# EAGLE board Placa 1.1.1} (EAGLE 9.7.0)
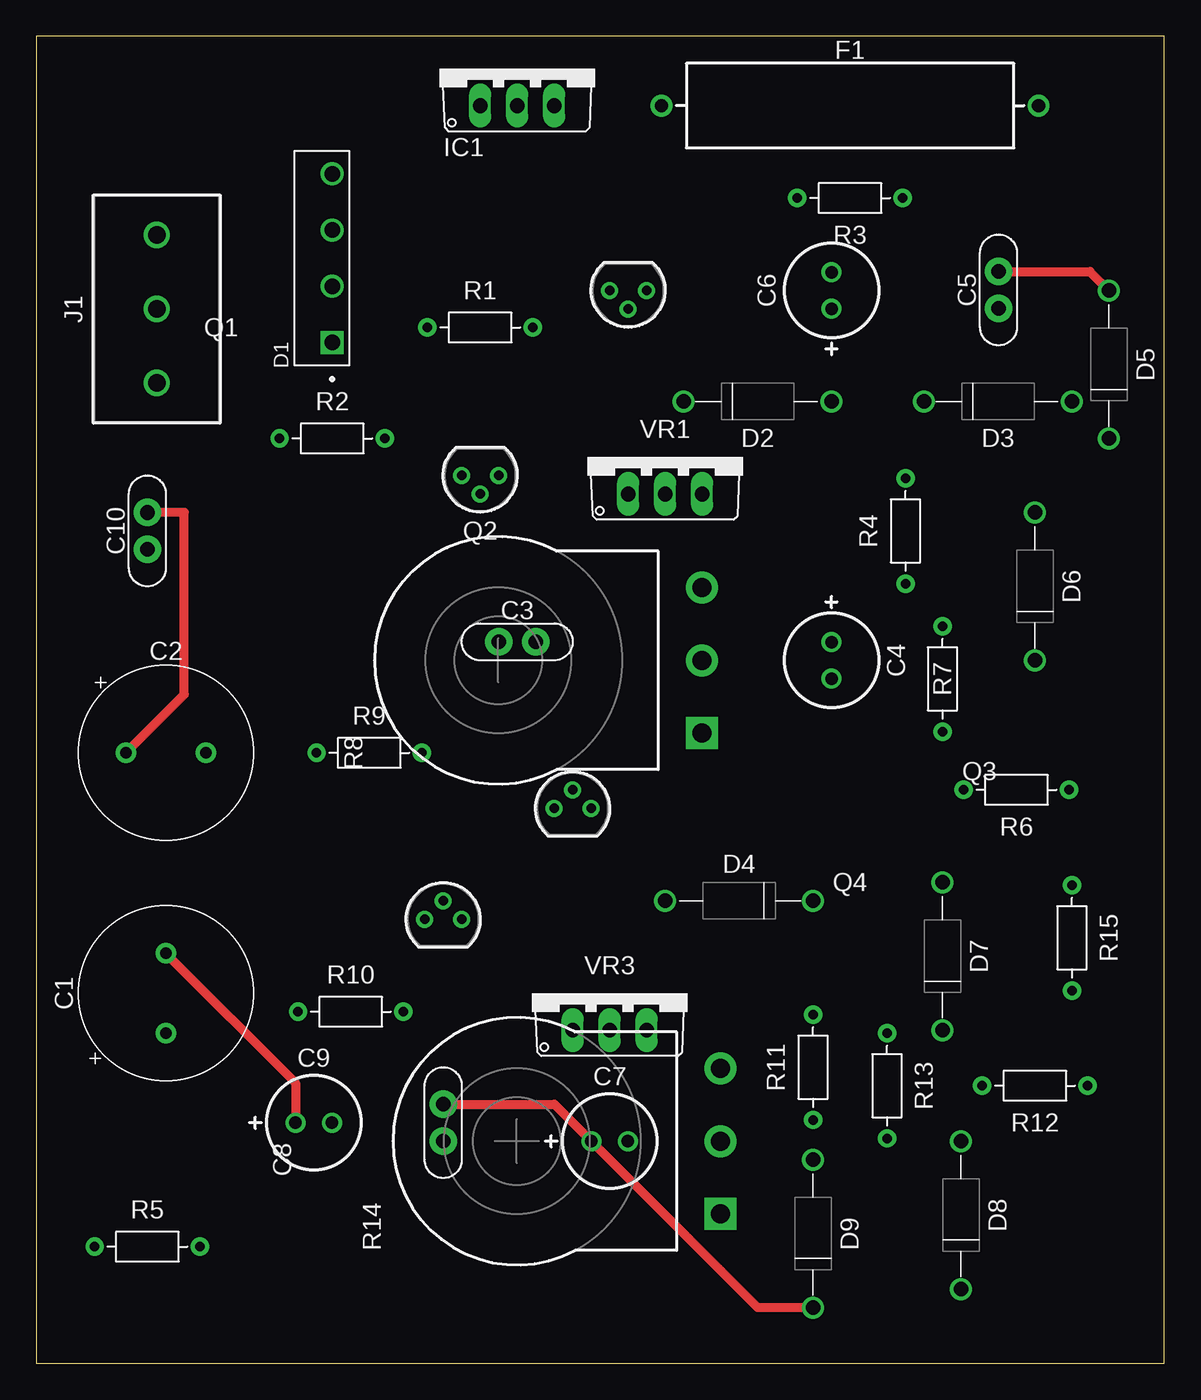
[diagram p0: board, top side]
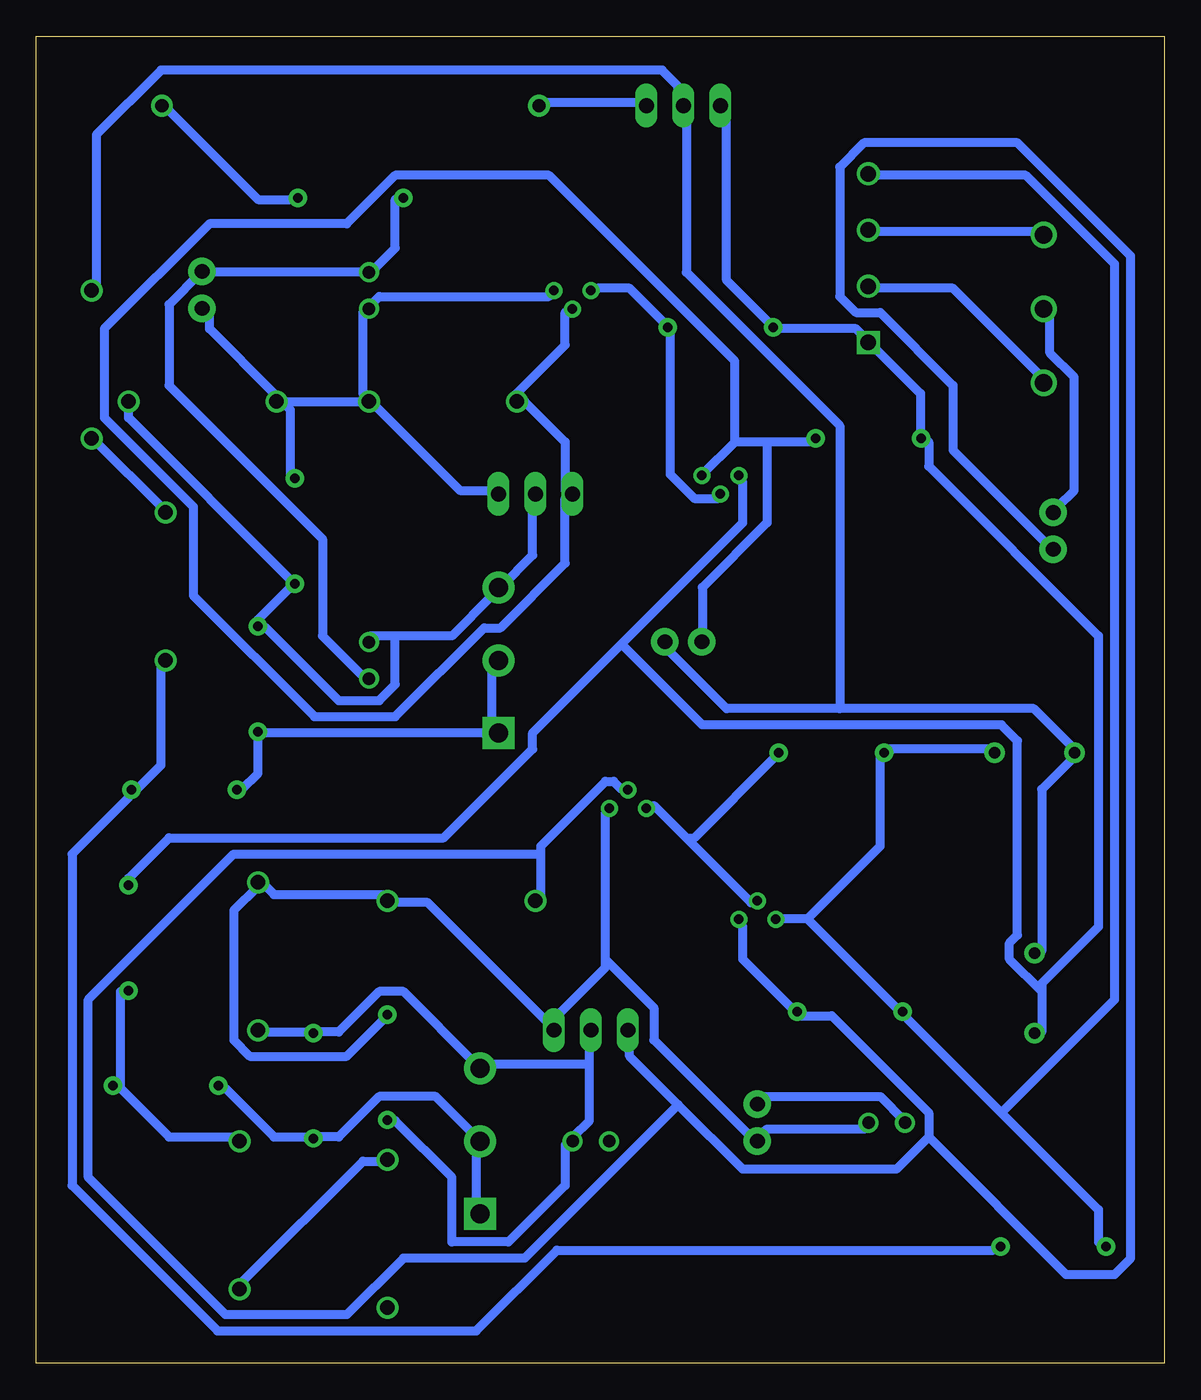
[diagram p1: board, bottom side, seen from below]

Size 77.45 x 91.11 mm. Coordinates in mm from the lower left corner, seen from the top.
Outline: 0,0 77.45,0 77.45,91.11 0,91.11 0,0
Copper layers (1*16): Top 0.035mm / dielectric 1.5mm / Bottom 0.035mm
Design rules "Fusion Electronics Design Rules": minimum track width 0.61mm, minimum drill 0.8mm, track to track 0.5mm, track to pad 0.5mm, pad to pad 0.5mm, via to via 0.5mm, smd to smd 6mil, copper to edge 40mil, drill to drill 6mil, minimum pad ring 10mil, minimum via ring 8mil, stop-mask expansion 4mil, vias tented up to drill 9999mil, thermal gap 10mil

## Footprints (pad centres in the part's own frame; a part is rotated, then mirrored left to right if it is on the bottom)
CAPPRD550W60D1200H2000B = drill 0.8 pad 1.4: 1 -2.75,0; 2 2.75,0
CAP-THRU-2.54MM = drill 1.016 pad 1.88: 1 -1.27,0; 2 1.27,0
CAPPRD250W80D630H800B = drill 0.864 pad 1.372: 1 -1.25,0; 2 1.25,0
SIP380W81P386L1470H1270Q4 = drill 1.06 pad 1.59 square: 1 0,0 | drill 1.06 pad 1.59: 2 3.865,0; 3 7.73,0; 4 11.595,0
DIODE-AXIAL = drill 1: 1 -5.08,0; 2 5.08,0
FUSAD2590W70L2150D550B = drill 0.9 pad 1.5: 1 -12.95,0; 2 12.95,0
TO220V = drill 1.016 long: 1 -2.54,-2.54; 2 0,-2.54; 3 2.54,-2.54
TERMBLK_508-3N = drill 1.2: 1 -5.08,0; 2 0,0; 3 5.08,0
TO92 = drill 0.66: 1 -1.27,0; 2 0,1.27; 3 1.27,0
RESAD724W46L381D178B = drill 0.66 pad 1.26: 1 -3.62,0; 2 3.62,0
WH148-5.0 = drill 1.3 pad 2.2 square: 1 -5,0 | drill 1.3 pad 2.2: 2 0,0; 3 5,0

## Placement (x,y rotation side)
C1  10000uF  [CAPPRD550W60D1200H2000B]  8.89,25.4 90 top
C2  10000uF  [CAPPRD550W60D1200H2000B]  8.89,41.91 0 top
C3  100nF  [CAP-THRU-2.54MM]  33.02,49.53 0 top
C4  10uF  [CAPPRD250W80D630H800B]  54.61,48.26 270 top
C5  100nF  [CAP-THRU-2.54MM]  66.08,73.7 90 top
C6  10uF  [CAPPRD250W80D630H800B]  54.61,73.66 90 top
C7  10uF  [CAPPRD250W80D630H800B]  39.37,15.24 0 top
C8  100nF  [CAP-THRU-2.54MM]  27.94,16.51 90 top
C9  10uF  [CAPPRD250W80D630H800B]  19.05,16.51 0 top
C10  100nF  [CAP-THRU-2.54MM]  7.62,57.15 90 top
D1  KBP206  [SIP380W81P386L1470H1270Q4]  20.32,70.08 90 top
D2  DIODEDIODE-AXIAL  [DIODE-AXIAL]  49.53,66.04 180 top
D3  DIODEDIODE-AXIAL  [DIODE-AXIAL]  66.04,66.04 180 top
D4  DIODEDIODE-AXIAL  [DIODE-AXIAL]  48.26,31.75 0 top
D5  DIODEDIODE-AXIAL  [DIODE-AXIAL]  73.66,68.58 270 top
D6  DIODEDIODE-AXIAL  [DIODE-AXIAL]  68.58,53.34 270 top
D7  DIODEDIODE-AXIAL  [DIODE-AXIAL]  62.23,27.94 270 top
D8  DIODEDIODE-AXIAL  [DIODE-AXIAL]  63.5,10.16 270 top
D9  DIODEDIODE-AXIAL  [DIODE-AXIAL]  53.34,8.89 270 top
F1  fusible  [FUSAD2590W70L2150D550B]  55.88,86.36 0 top
IC1  LM7805_TO220V  [TO220V]  33.02,88.9 0 top
J1  12-0-12  [TERMBLK_508-3N]  8.27,72.39 90 top
Q1  PNP_MJ2955G  [TO92]  40.64,73.66 180 top
Q2  PNP_2N2907  [TO92]  30.48,60.96 180 top
Q3  NPN_2N3055G  [TO92]  36.83,38.1 0 top
Q4  NPN_BD139G  [TO92]  27.94,30.48 0 top
R1  0.33  [RESAD724W46L381D178B]  30.48,71.12 0 top
R2  3.3  [RESAD724W46L381D178B]  20.32,63.5 0 top
R3  10  [RESAD724W46L381D178B]  55.88,80.01 180 top
R4  120  [RESAD724W46L381D178B]  59.69,57.15 90 top
R5  1k  [RESAD724W46L381D178B]  7.62,8 0 top
R6  7  [RESAD724W46L381D178B]  67.31,39.37 180 top
R7  5k  [RESAD724W46L381D178B]  62.23,46.99 270 top
R8  2k  [WH148-5.0]  45.72,48.26 90 top
R9  0.33  [RESAD724W46L381D178B]  22.86,41.91 0 top
R10  0.33  [RESAD724W46L381D178B]  21.59,24.13 0 top
R11  120  [RESAD724W46L381D178B]  53.34,20.32 90 top
R12  7  [RESAD724W46L381D178B]  68.58,19.05 180 top
R13  5k  [RESAD724W46L381D178B]  58.42,19.05 270 top
R14  2k  [WH148-5.0]  46.99,15.24 90 top
R15  1k  [RESAD724W46L381D178B]  71.12,29.21 270 top
VR1  LM317K  [TO220V]  43.18,62.23 0 top
VR3  LM317K  [TO220V]  39.37,25.4 0 top

## Library data of the parts
C1 C2 = Capacitor; CATEGORY_L1: Capacitor; CATEGORY_L2: Aluminum Electrolytic Capacitors; CATEGORY_L3: Radial Can; PACKAGE: Through Hole; PACKAGE_SIZE: 20MM-DIA
C3 C5 C8 C10 D2-D9 IC1 = Tinkercad
C4 C6 C7 C9 = Capacitor; CATEGORY_L1: Capacitor; CATEGORY_L2: Aluminum Electrolytic Capacitors; CATEGORY_L3: Radial Can; DESCRIPTION: Radial Polarized Capacitor, 0.098" (2.50mm) pitch, 0.248" Dia (6.30mm) body diameter, 0.315" (8.00mm) body height; PACKAGE: Through Hole
D1 = KBP206_RECTIFICADOR; AVAILABILITY: In Stock; CHECK_PRICES: https://www.snapeda.com/parts/KBP206/GeneSiC+Semiconductor/view-part/?ref=eda; DESCRIPTION: Bridge Rectifier Single Phase Standard 600 V Through Hole KBP; MF: GeneSiC Semiconductor; MP: KBP206; PACKAGE: SIP-4 GeneSiC Semiconductor; PRICE: None; SNAPEDA_LINK: https://www.snapeda.com/parts/KBP206/GeneSiC+Semiconductor/view-part/?ref=snap
F1 = Fuse; CATEGORY_L1: Circuit Protection; CATEGORY_L2: Fuses; CATEGORY_L3: Cartridge, Glass; CATEGORY_L4: Slow Blow; DESCRIPTION: FUSE GLASS 200MA 250VAC 5X20MM; HOLD_CURRENT: 200 mA; MANUFACTURER: Littelfuse Inc.; MAXTEMP: 125 C; MPN: 0213.200MXE; OPERATING_TEMPERATURE: -55°C ~ 125°C; PACKAGE: Through Hole; PACKAGE_SIZE: 5mm x 20mm (Axial); PART_STATUS: Obsolete; ROHS: Compliant; SERIES: 213; TRIP_CURRENT: 35A; VENDOR: Digikey; VPN: 0213.200MXE-ND
J1 = Connector; CATEGORY_L1: Connectors; CATEGORY_L2: Terminal Block; CATEGORY_L3: Screw Terminal - Rising Cage Clamp Side Wire Entry; DATASHEET: https://www.te.com/usa-en/product-282837-3.datasheet.pdf; DESCRIPTION: 3 Position Wire to Board Terminal Block Horizontal with Board 0.200" (5.08mm) Through Hole; MANUFACTURER: TE Connectivity AMP Connectors; MPN: 282837-3; OPERATING_TEMPERATURE: -40°C ~ 105°C; PACKAGE: Through Hole; PACKAGE_SIZE: NA; PART_STATUS: Active; PITCH: 0.200" (5.08mm); ROHS: Compliant; SERIES: Buchanan
Q1 Q2 = Transistor; CATEGORY_L1: Transistor; CATEGORY_L2: BJT; CATEGORY_L3: PNP; DATASHEET: https://www.analog.com/media/en/package-pcb-resources/package/pkg_pdf/to-92t/T-3-1.pdf; DESCRIPTION: Generic NPN Transistor through Hole TO92-CBE Package; PACKAGE: Through Hole; PACKAGE_SIZE: TO92
Q3 Q4 = Transistor; CATEGORY_L1: Transistor; CATEGORY_L2: BJT; CATEGORY_L3: NPN; DATASHEET: https://www.analog.com/media/en/package-pcb-resources/package/pkg_pdf/to-92t/T-3-1.pdf; DESCRIPTION: Generic NPN Transistor through Hole TO92-EBC Package; PACKAGE: Through Hole; PACKAGE_SIZE: TO92
R1-R7 R9-R13 R15 = Resistor; CATEGORY_L1: Resistors; DESCRIPTION: Axial Resistor 7.24 mm pitch 3.81 mm body length 1.78 mm body diameter; PACKAGE: Through Hole; PACKAGE_SIZE: Axial
R8 R14 = Potenciometro_WH148
VR1 VR3 = Mis_Componentes; CATEGORY_L1: Power Management IC; CATEGORY_L2: Voltage Regulators; CATEGORY_L3: Linear & LDO Regulators; DESCRIPTION: Linear Voltage Regulator IC TO-220; PACKAGE: Through Hole; PACKAGE_SIZE: TO-220; SERIES: LM7805

## Nets
+VIN: C1.1 D1.1 IC1.1 Q2.3 R1.1 R2.1 R15.1
-VIN: C2.2 D1.4 Q4.1 R5.1 R9.1 R10.1
AC1: D1.2 J1.1
AC2: D1.3 J1.3
GND: C1.2 C2.1 C3.2 C4.2 C5.2 C6.2 C7.1 C8.2 C9.1 C10.2 D5.1 D9.2 IC1.2 J1.2 R3.2
N$1: C5.1 C6.1 D2.1 D3.2 Q1.1 R4.2 VR1.3
N$2: R6.2 R7.2 R8.1 R8.2
N$3: Q1.3 Q2.2 R1.2
N$4: C3.1 D2.2 Q1.2 Q2.1 R2.2 VR1.1
N$5: C4.1 D3.1 R4.1 R7.1 R8.3 VR1.2
N$6: F1.1 IC1.3
N$7: D5.2 D6.1
N$8: D6.2 R5.2 R6.1
N$9: F1.2 R3.1
N$10: Q3.1 Q4.2 R9.2
N$11: C8.1 C9.2 D4.2 D7.1 Q3.3 R11.2 VR3.3
N$12: C10.1 D4.1 Q3.2 Q4.3 R10.2 VR3.1
N$13: C7.2 D7.2 R11.1 R13.1 R14.3 VR3.2
N$14: R12.2 R13.2 R14.1 R14.2
N$15: D8.2 D9.1
N$18: D8.1 R12.1 R15.2

## Tracks (layer width: path | path; a pad name or v marks a point on that pad's centre or on a via)
+VIN
  Bottom 0.61: 37.26,49.38 43.36,43.28 43.36,42.17 49.47,36.06 68.34,36.06 71.11,33.29 R15.1 | 37.26,49.38 28.93,57.71 28.93,60.48 Q2.3 | 8.4,25.52 8.4,26.08 4.51,29.96 4.51,49.94 16.17,61.59 16.17,63.26 R2.1 16.73,63.81 16.73,66.59 20.05,69.92 D1.1 20.61,70.47 21.17,71.03 26.71,71.03 R1.1 27.27,71.58 30.04,74.36 30.04,86.02 IC1.1 | 8.4,25.52 8.4,22.75 C1.1 | 37.26,49.38 31.71,43.84 11.17,43.84 10.06,42.73 10.06,29.41 10.62,28.85 10.62,27.74 8.4,25.52
-VIN
  Bottom 0.61: C2.2 11.73,42.17 18.95,42.17 R9.1 19.5,41.62 19.5,35.51 24.5,30.52 | 24.5,30.52 26.16,30.52 Q4.1 | 24.5,30.52 18.39,24.41 R10.1 17.84,23.85 11.17,17.2 | 11.17,17.2 4.51,10.54 4.51,8.31 R5.1 | 11.17,17.2 3.4,24.96 3.4,75.47 9.51,81.58 20.05,81.58 D1.4
AC1
  Bottom 0.61: D1.2 20.05,73.8 14.51,73.8 8.4,67.7 J1.1
AC2
  Bottom 0.61: D1.3 20.05,77.69 8.4,77.69 J1.3
GND
  Top 0.61: D9.2 49.55,3.81 C7.1 35.58,17.78 C8.2 | C1.2 17.8,19.24 C9.1 | C2.1 10.16,45.93 10.16,58.42 C10.2 | C5.2 72.36,74.97 D5.1
  Bottom 0.61: C1.2 8.4,28.3 8.4,39.39 6.18,41.62 C2.1 6.18,42.17 8.96,44.95 22.28,44.95 | 22.28,44.95 30.04,44.95 33.93,48.83 33.93,49.38 C3.2 | D5.1 73.33,73.8 73.33,84.35 68.89,88.79 34.48,88.79 33.38,87.68 33.38,86.57 IC1.2 32.82,86.02 32.82,74.92 22.28,64.37 22.28,44.95 | C9.1 17.84,16.64 19.5,18.3 27.83,18.3 C8.2 | J1.2 7.84,72.14 7.84,69.36 6.18,67.7 6.18,59.93 7.29,58.82 C10.2 | R3.2 52.8,79.91 52.8,76.58 54.46,74.92 C6.2 55.02,74.92 65.56,74.92 C5.2 66.12,74.92 68.34,72.69 68.34,67.14 57.79,56.6 57.79,49.94 55.02,47.16 C4.2
N$1
  Bottom 0.61: Q1.1 42.25,73.25 53.91,73.25 54.46,72.69 C6.1 55.02,72.14 55.02,66.59 D2.1 | 60.57,66.03 60.02,65.48 60.02,61.04 R4.2 | 60.57,66.03 55.02,66.03 D2.1 | 60.57,66.03 D3.2 61.12,66.59 65.56,71.03 65.56,72.14 C5.1 | VR1.3 46.14,59.93 48.36,59.93 54.46,66.03 D2.1
N$2
  Bottom 0.61: R6.2 63.34,39.39 62.23,40.51 62.23,43.28 R7.2 61.68,43.28 46.14,43.28 | 46.14,43.28 46.14,47.72 R8.2 | 46.14,43.28 R8.1
N$3
  Bottom 0.61: Q2.2 30.6,59.38 32.27,59.38 33.93,61.04 33.93,71.03 R1.2 34.48,71.58 36.7,73.8 38.92,73.8 Q1.3
N$4
  Bottom 0.61: Q1.2 41.14,72.14 41.14,69.92 44.47,66.59 D2.2 43.92,66.03 41.14,63.26 41.14,59.93 VR1.1 41.14,59.38 41.14,54.94 45.59,50.49 46.7,50.49 52.8,44.39 58.35,44.39 66.67,52.71 66.67,58.82 72.78,64.92 72.78,71.03 65.56,78.25 56.13,78.25 52.8,81.58 42.25,81.58 29.49,68.81 29.49,63.26 | 29.49,63.26 31.71,61.04 Q2.1 | 27.27,63.26 23.94,63.26 R2.2 | 27.27,63.26 29.49,63.26 | 27.27,63.26 27.27,57.71 31.71,53.27 31.71,49.94 C3.1
N$5
  Bottom 0.61: 52.8,49.94 48.91,49.94 46.14,52.71 R8.3 45.59,53.27 43.36,55.49 43.36,59.38 VR1.2 | 52.8,49.94 54.46,49.94 C4.1 | D3.1 71.11,64.92 60.02,53.83 R4.1 60.02,53.27 62.23,51.05 R7.1 61.68,50.49 56.68,45.5 53.91,45.5 52.8,46.61 52.8,49.94
N$6
  Bottom 0.61: F1.1 42.81,86.57 35.59,86.57 IC1.3
N$7
  Bottom 0.61: D6.1 68.89,58.82 73.33,63.26 D5.2
N$8
  Bottom 0.61: R5.2 11.73,7.76 41.7,7.76 47.25,2.21 65.01,2.21 75,12.2 75,34.95 71.11,38.84 R6.1 70.56,39.39 68.89,41.06 68.89,47.72 D6.2
N$9
  Bottom 0.61: R3.1 60.02,79.91 62.23,79.91 68.34,86.02 F1.2
N$10
  Bottom 0.61: 32.82,36.06 35.04,38.28 Q3.1 | 32.82,36.06 28.38,31.62 Q4.2 | 32.82,36.06 32.27,36.06 26.71,41.62 R9.2
N$11
  Bottom 0.61: R11.2 53.35,23.85 56.13,21.08 62.79,21.08 63.9,22.19 63.9,31.07 62.23,32.73 D7.1 61.68,32.73 61.12,32.18 53.35,32.18 D4.2 52.8,31.62 50.58,31.62 42.25,23.3 | C9.2 20.61,16.09 27.27,16.09 27.83,15.53 C8.1 28.38,15.53 35.04,22.19 35.04,24.41 38.37,27.74 | 38.37,27.74 38.37,27.19 42.25,23.3 | 38.37,27.74 38.37,37.73 Q3.3 | 42.25,23.3 VR3.3
N$12
  Bottom 0.61: 42.81,34.95 42.81,32.18 D4.1 | 42.81,34.95 42.81,35.51 38.37,39.95 37.81,39.95 37.26,39.39 Q3.2 | Q4.3 28.93,29.96 28.93,27.74 25.61,24.41 R10.2 25.05,23.85 22.83,23.85 16.17,17.2 16.17,15.53 | 33.38,17.75 28.93,13.31 18.39,13.31 16.17,15.53 | 33.38,17.75 36.7,21.08 36.7,22.75 VR3.1 | 16.17,15.53 6.73,6.09 3.4,6.09 2.3,7.2 2.3,76.03 10.06,83.8 20.61,83.8 22.28,82.13 22.28,73.25 21.17,72.14 19.5,72.14 14.51,67.14 14.51,62.7 7.84,56.05 C10.1 | 42.81,34.95 63.9,34.95 73.89,24.96 73.89,12.75 64.45,3.32 56.13,3.32 52.24,7.2 43.92,7.2 33.38,17.75
N$13
  Bottom 0.61: D7.2 61.68,22.75 58.91,22.75 R13.1 58.35,22.75 56.68,22.75 53.91,25.52 52.24,25.52 47.25,20.52 R14.3 46.7,20.52 39.48,20.52 | R11.1 52.8,16.64 48.91,12.75 48.91,8.31 45.03,8.31 41.14,12.2 41.14,14.97 C7.2 40.59,15.53 39.48,16.64 39.48,20.52 | 39.48,20.52 39.48,22.75 VR3.2
N$14
  Bottom 0.61: R12.2 64.45,18.86 61.12,15.53 58.91,15.53 R13.2 58.35,15.53 56.68,15.53 53.91,18.3 50.02,18.3 47.25,15.53 R14.2 47.25,14.97 47.25,10.54 R14.1
N$15
  Bottom 0.61: D9.1 53.35,13.86 55.02,13.86 63.34,5.54 D8.2
N$18
  Bottom 0.61: 71.67,18.86 71.67,25.52 R15.2 | 71.67,18.86 68.34,15.53 63.9,15.53 D8.1 | 71.67,18.86 R12.1